# Altium PCB ika_pcb.PcbDoc (part 3 of 3)
Units mil, origin at the board's own origin, x right, y up, seen from the top; angles counter-clockwise.
Board outline 5430 x 4360 mil, 2 copper layers (Top Layer, Bottom Layer); 129 components, 109 nets, 436 pads, 110 vias.
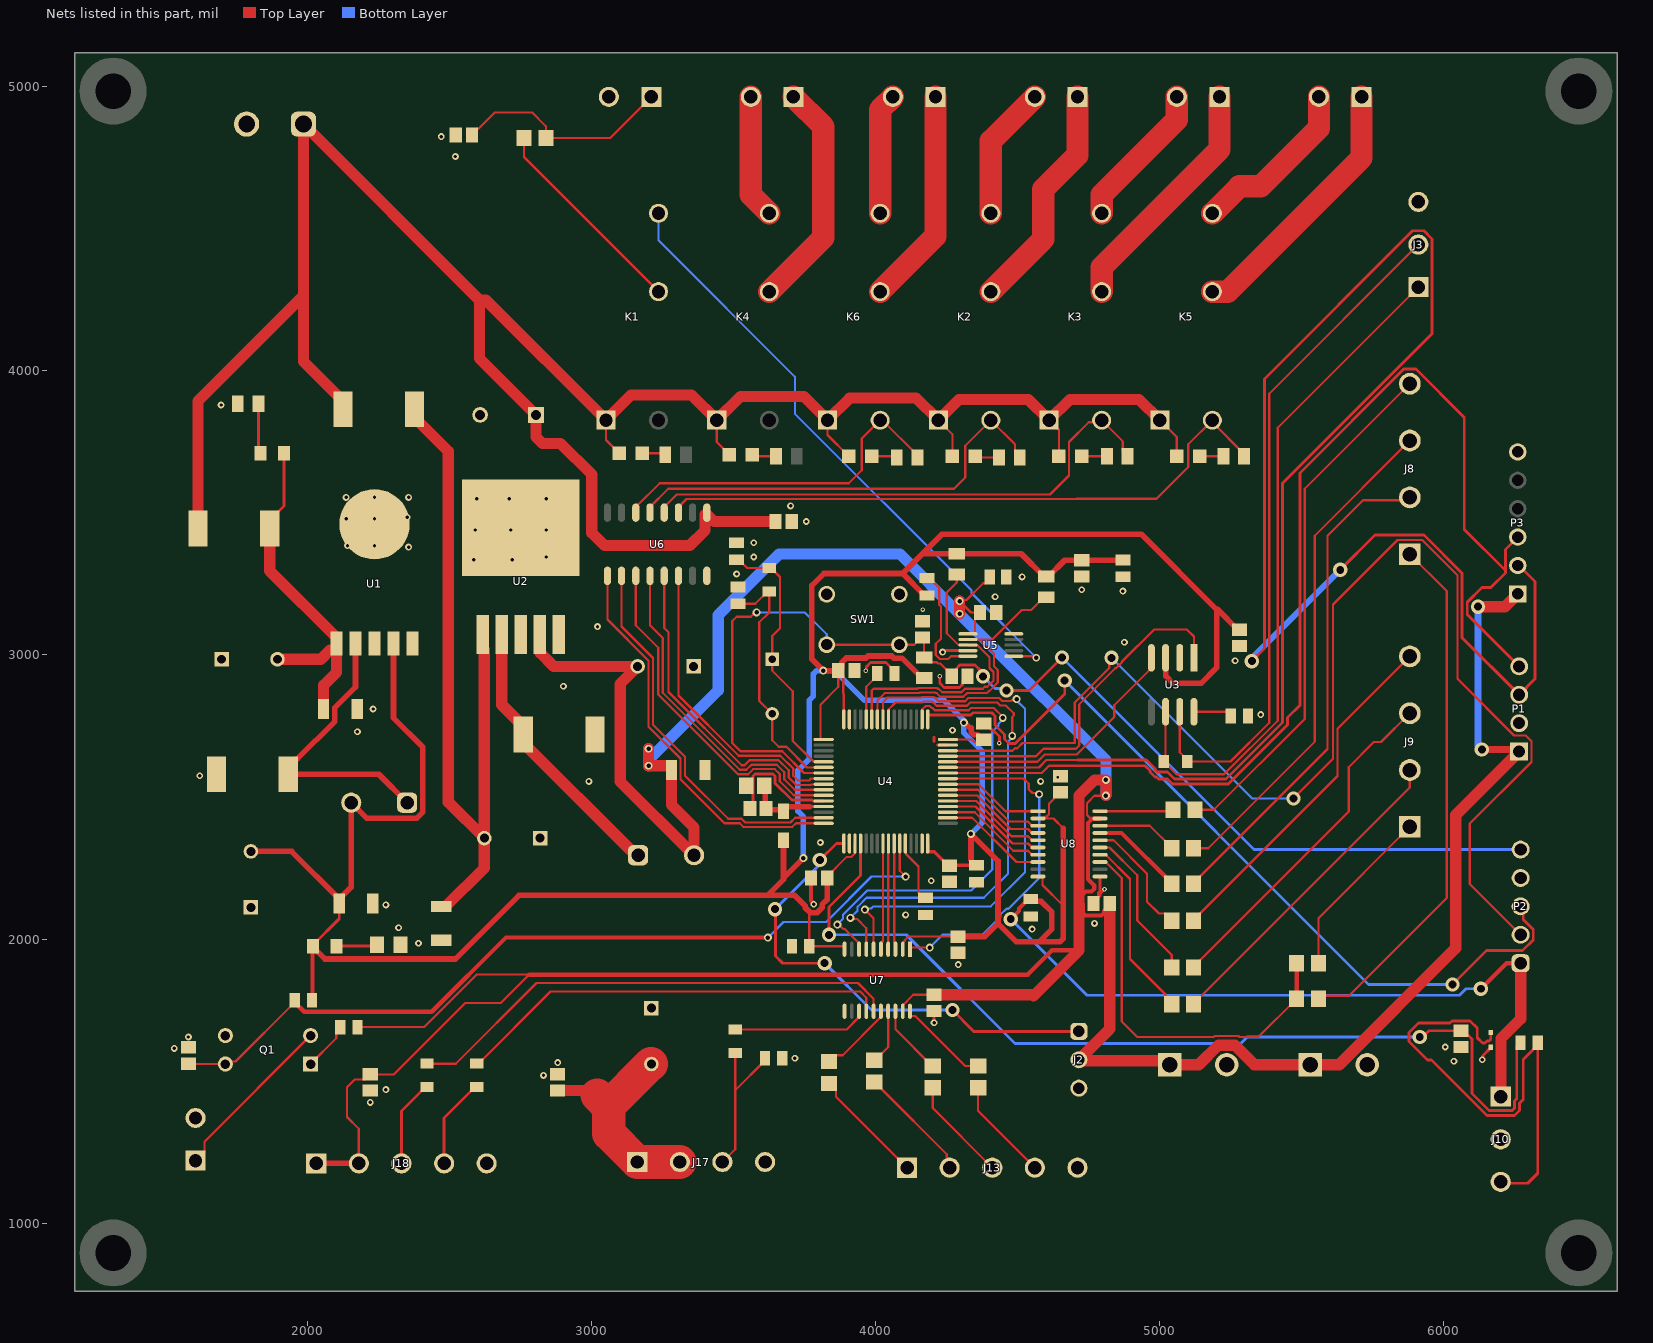
[diagram p2: the nets of this part, all layers, seen from the top]

## Via types
v1: diameter 24, hole 12, Top Layer to Bottom Layer, 63 vias
v2: diameter 27.56, hole 15.75, Top Layer to Bottom Layer, 22 vias
v3: diameter 50, hole 28, Top Layer to Bottom Layer, 19 vias
v4: diameter 16, hole 8, Top Layer to Bottom Layer, 5 vias
v5: diameter 12, hole 8, Top Layer to Bottom Layer, 1 vias

## Nets (pads, with @x,y where several pads share a name; then routed paths per layer and width w, separated by ;. In a path a pad name is that pad's centre, name@x,y a point inside that pad or via, vN(x,y) a via of type N, cw(c..) or ccw(c..) an arc to the next point about the centre after c; other vN are vias at no path point) (continued)
3.3V: C1.2 C3.1 C11.1 C12.2 C13.1 C17.1 C18.2 C19.2 C20.2 C21.2 C29.2 C31.2 D5.2 FB1.1 J10.01 L1.2 P2.1 R3.1 R5.2 R6.2 R10.2 R15.1 R31.2 R46.1 U1.4 U3.3 U4.1 U4.19 U4.32 U4.48 U4.64 U7.2 U7.10 U8.2 U8.10 | length 16013.2
  Top Layer w7.87: 3711.08,2153.54 3744.48,2120.15 3753.05,2111.57 ; 3765.55,2099.07 R46.1@3765.55,1975 3887.28,1975 3889.84,1972.44 U7.10@3889.84,1964.27 ; U4.1@3816.5,2702.64 3806.82,2702.64 3805,2704.46 3805,2825 3867.91,2887.91 C19.2@3867.91,2945 3885.63,2927.28 3885.63,2864.47 3887.36,2862.74 U4.64@3887.36,2773.5 ; C20.2@3828.54,2219.92 3897.87,2289.25 3914.39,2289.25 3925.98,2300.85 3925.98,2335.74 U4.19@3926.73,2336.5 ; U7.2@4094.57,1964.27 4094.57,1985.74 4101.64,1992.81 4101.64,1995.84 4114.46,2008.67 4289.88,2008.67 C29.2@4290,2008.54 ; U4.48@4253.5,2702.64 4337.36,2702.64 4346.23,2693.77 4362.41,2693.77 4366.18,2690 C18.2@4378.82,2702.64 ; U8.10@4570.73,2219.84 4584.21,2219.84 4586.77,2217.28 4586.77,2190.26 4660,2117.02 ; U8.2@4570.73,2424.57 U8.2@4592.21,2424.57 ; C31.2@4650,2516.46 4645.08,2516.46 4627.36,2498.74 4627.36,2493.82 4609.23,2475.68 4609.23,2438.56 4602.31,2431.64 4599.28,2431.64 U8.2@4592.21,2424.57 ; 4660,2390 4625.43,2424.57 U8.2@4592.21,2424.57
  Top Layer w10: D5.2@2018.66,1978.94 2110.94,2071.22 C3.1@2110.94,2125
  Top Layer w11.81: U4.32@4182.64,2336.5 4182.64,2307.36 4206.26,2307.36 4255.08,2258.54 C21.2@4260,2258.54 4260.98,2259.53 C17.1@4341.89,2259.53
  Top Layer w15: R3.1@2015.55,1785 2017.11,1786.55 2017.11,1973.45 D5.2@2018.66,1975 ; v3(4475,2070) 4503.84,2098.84 4503.84,2107.34 4537.05,2140.55 R31.2@4545,2140.55 ; v3(6130,1825) 6220,1915 P2.1@6270,1915
  Top Layer w19.68: C1.2@1800,2308.43 1943.27,2308.43 C3.1@2110.94,2140.75 ; D5.2@2018.66,1971.06 2060.16,1929.57 2519.57,1929.57 2743.54,2153.54 3618.54,2153.54 ; C3.1@2110.94,2125 C3.1@2110.94,2140.75 ; U1.4@2301.93,3040 2301.93,2778.7 2405.28,2675.35 2405.28,2446.73 2383.27,2424.72 2208.43,2424.72 L1.2@2153.15,2480 2153.15,2182.95 C3.1@2110.94,2140.75 ; FB1.1@3675,2347.64 3675,2215 ; v2(3745,2285) 3675,2215 ; C20.2@3828.54,2215 3828.54,2138.49 3811.07,2121.01 3811.07,2110.15 3793.66,2092.75 3769.04,2092.75 3751.63,2110.15 3751.63,2116.52 3714.61,2153.54 3711.08,2153.54 3618.54,2153.54 ; R15.1@4170,2918.56 4162.11,2918.56 4091.5,2989.17 4063.38,2989.17 4056.18,2996.37 3972.42,2996.37 3965.34,2989.29 3896.01,2989.29 3879.72,2973.01 3879.72,2956.81 C19.2@3867.91,2945 v2(3815,2945) 3775,2985 3775,3245 3816.85,3286.85 4094.65,3286.85 ; R10.2@4180,3209.45 4172.05,3209.45 4094.65,3286.85 ; C29.2@4290,2008.54 4383.54,2008.54 4430,2055 ; v2(4310,2762.28) 4312.13,2762.28 4330.12,2744.29 4335.71,2744.29 4335.71,2729.55 4346.09,2719.17 4357.36,2719.17 4375.08,2701.46 4377.64,2701.46 C18.2@4380,2701.46 ; C17.1@4355,2259.53 4347.13,2259.53 4338.27,2268.39 4338.27,2276.26 4335,2279.53 v2(4335,2370) 4430,2275 4430,2055 ; R31.2@4545,2140.55 4552.99,2132.56 4582.44,2132.56 4620,2095 4620,2035 4575,1990 ; 4660,2390 4660,2117.02 4660,2001.53 4648.47,1990 4575,1990 ; C11.1@4870,3334.53 4869.51,3334.04 4725.49,3334.04 C12.2@4725,3333.54 4665,3333.54 4607.89,3276.44 R6.2@4600,3276.44 4592.11,3276.44 4512.11,3356.44 R5.2@4285,3356.44 4164.24,3356.44 ; U3.3@5020,2990.02 5020.92,2989.1 5020.92,2925.61 5046.53,2900 5145,2900 5200,2955 5200,3160 ; C13.1@5280,3088.54 5275.08,3088.54 5203.62,3160 5200,3160 ; 3618.54,2153.54 3675,2210 3675,2215 ; 4094.65,3286.85 4164.24,3356.44 ; 4164.24,3356.44 4232.81,3425 4935,3425 5200,3160 ; 4430,2055 4495,1990 4575,1990
  Top Layer w40: J10.01@6200,1445 6200.75,1445.75 6200.75,1649.34 6270,1718.59 P2.1@6270,1915
  Bottom Layer w10: v3(4475,2070) 4742.87,1802.13 6055.31,1802.13 6078.18,1825 v3(6130,1825)
  Bottom Layer w19.68: v2(3745,2285) 3745,2430.59 3725.47,2450.12 3725.47,2593.57 3765,2633.1 3765,2840 3780,2855 3780,2933.47 3791.53,2945 v2(3815,2945) 3855,2945 3960,2840 4240,2840 4310,2770 v2(4310,2762.28) 4310,2725.59 4375,2660.59 4375,2410 v2(4335,2370)
3C: K6.4 R22.1 U6.14 | length 1262.3
  Top Layer w7.87: U6.14@3155,3501.22 3155,3520.91 3239.09,3605 3905,3605 3950.19,3650.19 3950.19,3761.84 K6.4@4015,3826.65 4022.68,3826.65 4146.44,3702.89 R22.1@4146.44,3695
4C: K2.4 R23.1 U6.13 | length 1585.4
  Top Layer w7.87: U6.13@3205,3501.22 3205,3520.91 3269.09,3585 4275,3585 4315,3625 4315,3736.65 K2.4@4405,3826.65 4489.6,3742.05 4489.6,3711.84 R23.1@4506.44,3695
5C: K3.4 R24.1 U6.12 | length 1920.2
  Top Layer w7.87: U6.12@3255,3501.22 3255,3520.91 3299.09,3565 4613.35,3565 4680,3631.65 4680,3750 4749.72,3819.72 4788.07,3819.72 K3.4@4795,3826.65 4869.6,3752.05 4869.6,3716.84 R24.1@4886.44,3700
5V: C6.2 C8.1 C15.1 C16.2 C30.2 C32.2 C34.1 J2.2 J6.1 J7.1 J18.01 J18.02 L2.2 P1.1 P3.1 R4.1 U2.4 U5.1 U7.19 U8.19 | length 14405.1
  Top Layer w7.87: R4.1@2175.55,1690 2410,1690 2595,1875 2780,1875 2680,1775 2555,1775 2303.54,1523.54 C34.1@2220,1523.54 2202.28,1505.83 2165.83,1505.83 2138.26,1478.26 2138.26,1373.52 2180,1331.78 J18.02@2180,1210 ; U7.19@4094.57,1745.73 4094.57,1766.31 4131.8,1803.54 C30.2@4205,1803.54 ; U5.1@4324.29,3074.37 4346.92,3074.37 4348.74,3076.19 4348.74,3132.28 C16.2@4366.46,3150 4335,3150 v2(4295,3190) 4298.77,3193.77 4319.24,3193.77 4377.83,3252.36 4385.71,3252.36 4400.47,3267.13 C15.1@4400.47,3275 ; 4755.43,2424.57 4743.26,2436.74 4743.26,2478.26 4769.41,2504.41 4809.41,2504.41 v2(4810,2505)
  Top Layer w15: 4715,2133.33 4720.64,2133.33 4729.43,2124.54 4729.43,2092.06 4738.44,2083.05 4794.48,2083.05 4803.48,2092.06 4803.48,2100.02 4823.54,2120.08 C32.2@4823.54,2125 ; 4729.43,2157.94 4738.75,2167.27 4759.57,2167.27 4768.89,2176.59 4768.89,2189.01 4747.21,2210.7 4747.21,2408.12 4762.86,2423.77 4788.48,2423.77 U8.19@4789.27,2424.57 ; P1.1@6258.05,2666.95 P1.1@6265,2660
  Top Layer w15.75: 2780,1875 3802.37,1875 3803.12,1874.25 3836.88,1874.25 3837.63,1875 4535,1875 4620,1960 4715,1960
  Top Layer w19.68: J18.01@2030,1210 J18.02@2180,1210
  Top Layer w25: v3(6133.54,2666.95) P1.1@6258.05,2666.95
  Top Layer w39.37: U2.4@2816.93,3071.81 2818.9,3069.84 2818.9,3007.25 2866.14,2960 C6.2@3161.57,2960 3100,2898.43 3100,2555 L2.2@3360,2295 3360,2393.06 3280.94,2472.11 C8.1@3280.94,2595 ; v2(3200,2670) v2(3200,2610) 3280.94,2610 C8.1@3280.94,2610.75 ; C30.2@4205,1803.54 4551.46,1803.54 4555,1800 4715,1960 4715,2133.33 4715,2505 4770,2560 v2(4810,2560) v2(4810,2505) ; v2(4295,3145) v2(4295,3190)
  Top Layer w40: C32.2@4823.54,2125 4823.54,1683.54 J2.2@4715,1575 4718.8,1571.2 5021.28,1571.2 J7.1@5035,1557.48 5137.12,1557.48 5206.33,1626.69 5263.67,1626.69 5332.88,1557.48 J6.1@5530,1557.48 5631.34,1557.48 6041.81,1967.95 6041.81,2436.81 P1.1@6265,2660 ; v3(6120,3170) 6215,3170 P3.1@6260,3215
  Bottom Layer w10: v3@6120,2680.49 v3(6133.54,2666.95)
  Bottom Layer w25: v3@6120,2680.49 v3(6120,3170)
  Bottom Layer w39.37: v2(3200,2610) 3200,2630.1 ; v2(3200,2670) 3200,2630.1 ; v2(4295,3190) v2(4295,3145) ; v2(4810,2505) v2(4810,2560) 4810,2630 4380,3060 v2(4295,3145) ; 3200,2630.1 3445,2875.1 3445,3140 3660,3355 4085,3355 v2(4295,3145)
6C: K5.4 R25.1 U6.11 | length 2246
  Top Layer w7.87: U6.11@3305,3501.22 3305,3520.91 3333.35,3549.25 4706.52,3549.25 4707.27,3550 4988.35,3550 5100,3661.65 5100,3741.65 K5.4@5185,3826.65 5185,3819.33 5296.44,3707.89 R25.1@5296.44,3700
12V: C27.1 C28.2 D1.2 D6.1 D7.1 D8.1 D9.1 D10.1 D11.1 D12.2 J1.1 K1.1 K2.1 K3.1 K4.1 K5.1 K6.1 U6.9 | length 8456.9
  Top Layer w7.87: K1.1@3049.96,3826.65 3049.96,3757.04 D6.1@3097,3710 ; K4.1@3439.96,3826.65 3439.96,3749.54 D7.1@3484.5,3705 ; K6.1@3829.96,3826.65 3829.96,3774.54 D8.1@3904.5,3700 ; K2.1@4219.96,3826.65 4269.5,3777.11 D9.1@4269.5,3700 ; K3.1@4609.96,3826.65 4644.5,3792.11 D10.1@4644.5,3700 ; K5.1@4999.96,3826.65 5059.5,3767.11 D11.1@5059.5,3700
  Top Layer w39.37: D1.2@1613.82,3445 1613.82,3893.82 1985,4265 ; D12.2@2123.82,3865 2123.82,3894.13 1985,4032.95 1985,4265 ; C28.2@3646.46,3470 3430.32,3470 3405.98,3494.33 3398.11,3494.33 3398.11,3438.11 3345,3385 3045,3385 3000,3430 3000,3635 2890,3745 2826.49,3745 2803.43,3768.06 C27.1@2803.43,3845 2605,4043.43 2605,4248.94 ; K5.1@4999.96,3826.65 4926.61,3900 4683.31,3900 K3.1@4609.96,3826.65 4536.61,3900 4293.31,3900 K2.1@4219.96,3826.65 4141.61,3905 3908.31,3905 K6.1@3829.96,3826.65 3746.61,3910 3523.31,3910 K4.1@3439.96,3826.65 3351.61,3915 3138.31,3915 K1.1@3049.96,3826.65 2627.68,4248.94 2605,4248.94 ; 1985,4265 J1.1@1985,4868.94 2605,4248.94
24V: C25.2 C26.2 J17.01 J17.02 | length 802.9
  Top Layer w39.37: C26.2@2880,1466.46 3002.08,1466.46 3018.54,1450
  Top Layer w118.11: 3018.54,1450 3057.85,1410.69 ; C25.2@3210,1560 3207.15,1560 3057.85,1410.69 ; J17.02@3310,1215 J17.01@3160,1215 3060,1315 3060,1390.81 3057.85,1392.97 3057.85,1410.69
A1: U4.40 U8.1 | length 356.6
  Top Layer w7.87: U4.40@4253.5,2545.16 4361.37,2545.16 4456.37,2450.16 U8.1@4570.73,2450.16
A2: U4.39 U8.3 | length 369.6
  Top Layer w7.87: U4.39@4253.5,2525.47 4358.78,2525.47 4470.87,2413.39 4535.75,2413.39 4550.16,2398.98 U8.3@4570.73,2398.98
A3: U4.38 U8.4 | length 372.1
  Top Layer w7.87: U4.38@4253.5,2505.79 4356.2,2505.79 4474.19,2387.8 4535.75,2387.8 4550.16,2373.39 U8.4@4570.73,2373.39
A4: U4.37 U8.5 | length 374.5
  Top Layer w7.87: U4.37@4253.5,2486.1 4353.61,2486.1 4477.51,2362.2 4535.75,2362.2 4550.16,2347.8 U8.5@4570.73,2347.8
A5: U4.36 U8.6 | length 377
  Top Layer w7.87: U4.36@4253.5,2466.42 4351.02,2466.42 4480.83,2336.61 4535.75,2336.61 4550.16,2322.2 U8.6@4570.73,2322.2
A6: U4.35 U8.7 | length 379.4
  Top Layer w7.87: U4.35@4253.5,2446.73 4348.44,2446.73 4484.15,2311.02 4535.75,2311.02 4550.16,2296.61 U8.7@4570.73,2296.61
A7: U4.34 U8.8 | length 381.9
  Top Layer w7.87: U4.34@4253.5,2427.05 4339.04,2427.05 4495.07,2271.02 U8.8@4570.73,2271.02
CAN_RX: U3.4 U4.44 | length 913.4
  Top Layer w7.87: U4.44@4253.5,2623.9 4568.9,2623.9 4595,2650 4707.27,2650 4839.17,2781.9 4839.17,2822.84 4970,2953.66 U3.4@4970,2990.02
CAN_TX: U3.1 U4.45 | length 1222.9
  Top Layer w7.87: U4.45@4253.5,2643.58 4563.58,2643.58 4590,2670 4705,2670 4716.14,2681.14 4716.14,2826.14 4843.19,2953.19 4845.25,2953.19 4866.81,2974.75 4866.81,2976.81 4980,3090 5095,3090 5120,3065 U3.1@5120,2990.02
CANH: J3.02 R7.2 U3.7 | length 2432.3
  Top Layer w7.87: U3.7@5070,2799.98 5070,2657.24 5096.34,2630.91 R7.2@5096.34,2625 5248.87,2625 5385,2761.13 5385,3920 J3.02@5910,4445
CANL: J3.01 R7.1 U3.6 | length 2410.4
  Top Layer w7.87: U3.6@5020,2799.98 5020,2631.34 R7.1@5013.66,2625 5013.66,2619.09 5027.44,2605.31 5033.35,2605.31 5058.66,2580 5226.15,2580 5415,2768.85 5415,3800 J3.01@5910,4295
CUBE_RX_OUT: P1.4 P3.3 U4.42 | length 4249.1
  Top Layer w7.87: U4.42@4253.5,2584.53 4584.53,2584.53 4610,2610 4710,2610
  Top Layer w10: 4710,2610 4948.15,2610 4965.2,2592.95 4965.2,2588.64 4983.21,2570.63 4987.52,2570.63 4994.96,2563.19 5026.42,2563.19 5044.29,2545.32 5240.51,2545.32 5449.69,2754.49 5449.69,2779.77 5493.19,2823.27 5493.19,3640.68 5858.77,4006.26 5901.23,4006.26 6071.63,3835.86 6071.63,3442.01 6216.61,3297.03 ; P3.3@6260,3415 6216.61,3371.61 6216.61,3297.03 ; P1.4@6265,2960 6082.13,3142.87 6082.13,3185.69 6133.65,3237.22 6165.09,3237.22 6216.61,3288.74 6216.61,3297.03
CUBE_TX_IN: P1.3 P3.2 U4.43 | length 7056.2
  Top Layer w7.87: U4.43@4253.5,2604.21 4574.21,2604.21 4600,2630 4710,2630
  Top Layer w10: 4710,2630 4953.43,2630 4983.07,2600.36 4983.07,2596.05 4990.61,2588.5 5026.38,2588.5 5051.7,2563.19 5233.11,2563.19 5431.81,2761.89 5431.81,3604.58 5958.31,4131.08 5958.31,4465.01 5930.01,4493.31 5889.99,4493.31 5368.19,3971.51 5368.19,3022.63 v3(5323.64,2978.08) ; v3(5635,3300) 5757.01,3422.01 5930.24,3422.01 6064.25,3288 6064.25,3060.75 P1.3@6265,2860 6321.26,2916.26 6321.26,3258.25 6264.51,3315 P3.2@6260,3315
  Bottom Layer w19.68: v3(5323.64,2978.08) 5323.64,2988.64 v3(5635,3300)
DAC_OUT_A: K1.2 U5.6 | length 2197.5
  Top Layer w7.87: U5.6@4485.71,2995.63 4554.04,2995.63 4559.67,2990 v2(4565,2990)
  Bottom Layer w7.87: K1.2@3235,4555 3235,4460 3715,3980 3715,3849.54 4336.5,3228.05 4336.5,3218.5 v2(4565,2990)
ECHO_1: R30.1 U8.20 | length 259.3
  Top Layer w7.87: U8.20@4789.27,2450.16 5041.74,2450.16 R30.1@5046.58,2455
ECHO_2: R28.1 U8.18 | length 286.3
  Top Layer w7.87: U8.18@4789.27,2398.98 4964.72,2398.98 5041.58,2322.12 R28.1@5041.58,2320
ECHO_3: R27.1 U8.17 | length 327.4
  Top Layer w15: U8.17@4789.27,2373.39 4865.31,2373.39 5041.58,2197.12 R27.1@5041.58,2195
ECHO_4: R32.1 U8.16 | length 428.3
  Top Layer w7.87: U8.16@4789.27,2347.8 4837.2,2347.8 4955,2230 4955,2131.58 4996.74,2089.85 5018.85,2089.85 5041.58,2067.12 R32.1@5041.58,2065
ECHO_5: R29.1 U8.15 | length 546.4
  Top Layer w7.87: U8.15@4789.27,2322.2 4822.8,2322.2 4920,2225 4920,2065 5041.58,1943.42 R29.1@5041.58,1900
ECHO_6: R26.1 U8.14 | length 643.2
  Top Layer w7.87: U8.14@4789.27,2296.61 4809.84,2296.61 4895,2211.45 4895,1930 5020.09,1804.91 5020.09,1791.49 R26.1@5041.58,1770
GND: C1.1 C2.1 C3.2 C4.2 C5.1 C6.1 C7.2 C8.2 C9.1 C10.1 C11.2 C12.1 C13.2 C14.1 C15.2 C16.1 C17.2 C18.1 C19.1 C20.1 C21.1 C22.1 C23.1 C24.1 C25.1 C26.1 C27.2 C28.1 C29.1 C30.1 C31.1 C32.1 C33.1 C34.2 C35.1 C36.1 D2.2 D3.2 D13.2 J1.2 J2.3 J3.03 J4.02 J6.2 J7.2 J10.02 J11.02 J13.05 J17.04 J18.05 P1.2 P2.4 P3.6 Q1.3 R1.1 R2.1 R9.2 R11.1 R13.2 R18.1 R31.1 R46.2 SW1.A1 SW1.A2 U1.3 U1.5 U1.6 U2.3 U2.5 U2.6 U3.2 U4.12 U4.18 U4.31 U4.47 U4.63 U5.4 U5.10 U6.8 U7.11 U8.11 | length 1321.6
  Top Layer w10: C23.1@3556.46,2460 3568.03,2471.58 3568.03,2573.88 3575.57,2581.42 3637.42,2581.42 3644.96,2573.88 3644.96,2548.6 3704.42,2489.13 3775.83,2489.13 3778.51,2486.45 3816.15,2486.45 U4.12@3816.5,2486.1 ; v4(3965,2945) 3966.15,2946.15 3966.15,2957.97 3981.83,2973.66 4035.4,2973.66 4066.11,2942.95 R13.2@4066.11,2935 ; v1(4205,1705) C30.1@4205,1746.46 ; 4205.2,2694.86 4205.2,2710.42 ; 4216.76,2683.3 4253.16,2683.3 U4.47@4253.5,2682.95 ; v4(4225,2925) 4225,2901.01 4240.45,2885.55 4294.43,2885.55 4305.91,2897.03 4305.91,2908.35 C35.1@4322.56,2925 ; v1(4235,3010) 4238.79,3010 4244.1,3015.32 U5.4@4324.29,3015.32 ; C18.1@4380,2758.54 4384.92,2758.54 4407.48,2735.98 4411.91,2735.98 4434.89,2713 4434.89,2690.11 v4(4435,2690) ; U8.11@4789.27,2219.84 4789.27,2168.15 4783.11,2161.99 4783.11,2141.65 C32.1@4766.46,2125 4766.46,2129.92 4789.02,2152.48 4789.02,2158.46 4805,2174.44 v4(4805,2175) ; v1(6135,1575) 6137.68,1577.68 6137.68,1590.12 6165,1617.44 D13.2@6165,1619.02
  Top Layer w15: C20.1@3771.46,2215 3771.46,2134.79 3781.35,2124.9 v1(3781.35,2122.46)
  other v1: 2220,1425 2275,1470 2830,1520 2880,1565 6035,1570 3715,1580 1530,1615 6005,1620 1580,1655 4290,1910 2390,1985 4550,2035 2320,2040 4770,2055 4105,2085 2275,2120 4195,2205 3805,2340 2990,2555 4580,2555 1620,2575 2175,2730 4270,2735 5355,2790 2230,2810 2900,2890 5265,2980 4875,3045 3020,3100 4420,3205 4870,3225 4725,3230 4515,3275 3510,3285 2585,3335 2720,3335 2840,3345 3570,3345 2355,3380 2140,3385 2235,3385 3570,3395 2590,3440 2715,3440 2840,3440 3755,3470 2135,3480 2235,3480 2350,3485 3700,3525 2595,3550 2710,3550 2840,3550 2135,3555 2235,3555 2355,3555 1695,3880 2520,4755 2470,4825
  other v4: 4165,3160
  other v5: 4640,2570
I2C1_SCL: R6.1 U4.58 U5.2 | length 1043.5
  Top Layer w7.87: U4.58@4005.47,2773.5 4005.47,2839.72 4031.5,2865.75 4153.49,2865.75 4155.73,2867.99 4209.55,2867.99 4211.79,2865.75 4214.21,2865.75 4226.97,2852.99 4307.91,2852.99 4320.67,2865.75 4390.75,2865.75 4397.44,2872.44 4398.86,2872.44 4429.65,2903.23 4429.65,2946.77 4415.75,2960.67 4415.75,3004.25 4366.07,3053.93 ; U5.2@4324.29,3054.69 4366.07,3054.69 4409.69,3054.69 4513.56,3158.56 4547.11,3158.56 4592.11,3203.56 R6.1@4600,3203.56
I2C1_SDA: R5.1 U4.59 U5.3 | length 1051.1
  Top Layer w7.87: U4.59@3985.79,2773.5 3985.79,2875.39 3991.9,2881.5 4146.96,2881.5 4149.21,2883.74 4216.07,2883.74 4218.31,2881.5 4220.74,2881.5 4233.49,2868.74 4301.39,2868.74 4314.15,2881.5 4376.5,2881.5 4383.19,2888.19 4392.33,2888.19 4413.9,2909.75 4413.9,2940.25 4400,2954.15 4400,2992.22 4357.97,3034.25 U5.3@4324.29,3034.25 ; R5.1@4285,3283.56 4285,3255 4250,3220 4250,3076.36 4290.61,3035.75 4323.54,3035.75 U5.3@4324.29,3035
LPWM: U4.57 U7.6 | length 1947.7
  Top Layer w7.87: v2(3961.5,2103.5) 3992.2,2072.8 U7.6@3992.2,1964.27 ; U4.57@4025.16,2773.5 4025.16,2833.66 4041.5,2850 4160.01,2850 4162.25,2852.24 4203.02,2852.24 4205.27,2850 4207.69,2850 4220.45,2837.24 4314.44,2837.24 4325.7,2848.5 4434.44,2848.5 4444.75,2838.19 4475.25,2838.19 4477.93,2840.87 4491.66,2840.87 v2(4495.42,2844.64)
  Bottom Layer w7.87: v2(3961.5,2103.5) 3965.27,2107.26 3983.29,2107.26 3991.03,2115 4405,2115 4525,2235 4525,2810.54 4495.42,2840.12 v2(4495.42,2844.64)
LPWM_OUT: R16.1 U7.15 | length 1756.8
  Top Layer w7.87: R16.1@2420,1561.34 2521.34,1561.34 2805,1845 3937.27,1845 3992.2,1790.07 U7.15@3992.2,1745.73
NetC2_2: C2.2 C4.1 D12.1 U2.1 | length 2643.7
  Top Layer w39.37: D12.1@2376.18,3865 2376.18,3835.87 2495,3717.05 2495,2481.57 C2.2@2621.57,2355 ; C4.1@2470,2114.06 2485.75,2114.06 2621.57,2249.88 C2.2@2621.57,2355 ; U2.1@2616.14,3071.81 2616.14,3024.57 2621.57,3019.13 C2.2@2621.57,2355
NetC5_2: C5.2 C7.1 D1.1 D4.2 U1.1 | length 1279.9
  Top Layer w10: D1.1@1866.18,3474.13 1916.34,3524.29 D4.2@1916.34,3710
  Top Layer w39.37: D1.1@1866.18,3474.13 D1.1@1866.18,3445 1866.18,3296.42 2101.14,3061.46 U1.1@2101.14,3040 ; C5.2@1893.43,2985 2046.14,2985 2078.31,3017.17 2099.76,3017.17 2101.14,3018.54 U1.1@2101.14,3040 ; C7.1@2055.94,2810 2055.94,2893.23 2101.14,2938.43 U1.1@2101.14,3040
NetC36_2: C36.2 J11.01 R47.2 | length 789.2
  Top Layer w7.87: C36.2@2578.54,4830 2578.54,4834.92 2596.26,4852.64 2601.18,4852.64 2658.54,4910 2790,4910 2838.42,4861.58 R47.2@2838.42,4820 3065,4820 J11.01@3210,4965
NetD2_1: D2.1 L1.1 U1.2 | length 1022.5
  Top Layer w19.68: U1.2@2168.07,3040 2168.07,2887.2 2095.47,2814.6 2095.47,2766.35 1962.27,2633.15 1955.2,2633.15 1931.18,2609.13 D2.1@1931.18,2580 2250,2580 L1.1@2350,2480
NetD3_1: D3.1 L2.1 U2.2 | length 980.6
  Top Layer w39.37: U2.2@2683.07,3071.81 2683.07,2824.88 2758.82,2749.13 D3.1@2758.82,2720 2758.82,2690.87 3138.94,2310.75 3147.4,2310.75 L2.1@3163.15,2295
NetD4_1: D4.1 R1.2 | length 178
  Top Layer w10: R1.2@1826.44,3885 1826.44,3717.23 D4.1@1833.66,3710
NetD5_1: D5.1 R2.2 | length 144.4
  Top Layer w10: D5.1@2101.34,1975 2238.66,1975 R2.2@2243.66,1980
NetD6_2: D6.2 R20.2 | length 82.6
  Top Layer w7.87: D6.2@3178,3710 3253.56,3710 R20.2@3258.56,3705
NetD7_2: D7.2 R21.2 | length 85.1
  Top Layer w7.87: D7.2@3565.5,3705 3570.5,3700 R21.2@3648.56,3700
NetD8_2: D8.2 R22.2 | length 90.1
  Top Layer w7.87: D8.2@3985.5,3700 4068.56,3700 R22.2@4073.56,3695
NetD9_2: D9.2 R23.2 | length 85.1
  Top Layer w7.87: D9.2@4350.5,3700 4355.5,3695 R23.2@4433.56,3695
NetD10_2: D10.2 R24.2 | length 88.1
  Top Layer w7.87: D10.2@4725.5,3700 R24.2@4813.56,3700
NetD11_2: D11.2 R25.2 | length 83.1
  Top Layer w7.87: D11.2@5140.5,3700 R25.2@5223.56,3700
NetD13_1: D13.1 J10.03 R35.1 | length 1785.6
  Top Layer w10: D13.1@6165,1670.98 6165,1647.2 6159.14,1641.34 6151.79,1641.34 6144.25,1633.8 6135.97,1633.8 6117.32,1652.44 6117.32,1686.2 6091.91,1711.61 6028.09,1711.61 6020.55,1704.07 5910.51,1704.07 5877.13,1670.69 5877.13,1639.31 5941.73,1574.71 5955.94,1574.71 6151.83,1378.82 6248.17,1378.82 6266.18,1396.83 6266.18,1422.11 6279.24,1435.17 6279.24,1575.74 R35.1@6330.55,1627.05 ; J10.03@6200,1145 6205,1140 6295,1140 6330.55,1175.55 R35.1@6330.55,1627.05 ; R35.1@6330.55,1635 R35.1@6330.55,1627.05
NetJ8_1: J8.1 R14.2 | length 1862.8
  Top Layer w7.87: R14.2@5558.42,1790 5568.42,1800 5665.57,1800 6010,2144.43 6010,3225 J8.1@5880,3355
NetJ8_2: J8.2 R27.2 | length 1766.3
  Top Layer w7.87: R27.2@5118.42,2195 5118.42,2197.12 5590,2668.7 5590,3420 5715,3545 5870,3545 J8.2@5880,3555
NetJ8_3: J8.3 R28.2 | length 1780.7
  Top Layer w7.87: R28.2@5118.42,2320 5170,2320 5545,2695 5545,3420 J8.3@5880,3755
NetJ8_4: J8.4 R30.2 | length 1852.4
  Top Layer w7.87: R30.2@5123.42,2455 5190,2455 5510,2775 5510,3585 J8.4@5880,3955
NetJ9_1: J9.1 R12.2 | length 613.2
  Top Layer w7.87: R12.2@5558.42,1915 5558.42,2073.42 J9.1@5880,2395
NetJ9_2: J9.2 R26.2 | length 1140.5
  Top Layer w7.87: R26.2@5118.42,1770 5118.42,1772.12 5880,2533.7 J9.2@5880,2595
NetJ9_3: J9.3 R29.2 | length 1225.1
  Top Layer w7.87: R29.2@5118.42,1900 5118.42,1902.12 5665,2448.7 5665,2605 5753.41,2693.41 5778.41,2693.41 J9.3@5880,2795
NetJ9_4: J9.4 R32.2 | length 1245.5
  Top Layer w7.87: R32.2@5118.42,2065 5118.42,2067.12 5625,2573.7 5625,2740 J9.4@5880,2995
NetJ12_01: J12.01 K2.3 | length 811.9
  Top Layer w78.74: K2.3@4405,4279.41 4590,4464.41 4590,4640 4710,4760 J12.01@4710,4965
NetJ12_02: J12.02 K2.2 | length 474.2
  Top Layer w78.74: K2.2@4405,4555 4405,4810 J12.02@4560,4965
NetJ13_01: J13.01 R33.2 | length 411.7
  Top Layer w7.87: R33.2@3835,1491.58 3837.12,1491.58 3859.85,1468.85 3859.85,1445.15 J13.01@4110,1195
NetJ13_02: J13.02 R34.2 | length 412.6
  Top Layer w7.87: R34.2@3995,1496.58 3997.12,1496.58 4019.85,1473.85 4019.85,1471.74 4249.34,1242.24 4249.34,1205.66 J13.02@4260,1195
NetJ13_03: J13.03 R36.2 | length 368.6
  Top Layer w7.87: R36.2@4200,1476.58 4200,1405 J13.03@4410,1195
NetJ13_04: J13.04 R37.2 | length 364.4
  Top Layer w7.87: R37.2@4360,1476.58 4360,1395 J13.04@4560,1195
NetJ15_01: J15.01 K3.3 | length 857.5
  Top Layer w78.74: K3.3@4795,4279.41 4795,4365 5210,4780 J15.01@5210,4965
NetJ15_02: J15.02 K3.2 | length 519.8
  Top Layer w78.74: K3.2@4795,4555 4795,4620 5060,4885 J15.02@5060,4965
NetJ16_01: J16.01 K4.3 | length 807.8
  Top Layer w78.74: K4.3@3625,4279.41 3815,4469.41 3815,4860 J16.01@3710,4965
NetJ16_02: J16.02 K4.2 | length 436.9
  Top Layer w78.74: J16.02@3560,4965 3560,4620 K4.2@3625,4555
NetJ17_03: J17.03 R18.2 R19.2 | length 560.6
  Top Layer w7.87: J17.03@3460,1215 3505,1260 3505,1465 ; R19.2@3505,1598.66 3505,1465 ; R18.2@3609.45,1580 3609.45,1572.05 3505,1467.61 3505,1465
NetJ18_03: J18.03 R16.2 | length 309.4
  Top Layer w10: J18.03@2330,1210 2330,1394.57 R16.2@2414.09,1478.66
  Top Layer w19.68: R16.2@2414.09,1478.66 R16.2@2420,1478.66
NetJ18_04: J18.04 R17.2 | length 319.8
  Top Layer w10: J18.04@2480,1210 2480,1369.57 R17.2@2589.09,1478.66
  Top Layer w19.68: R17.2@2589.09,1478.66 R17.2@2595,1478.66
NetJ19_01: J19.01 K5.3 | length 934.9
  Top Layer w78.74: K5.3@5185,4279.41 5239.41,4279.41 5710,4750 J19.01@5710,4965
NetJ19_02: J19.02 K5.2 | length 609.3
  Top Layer w78.74: K5.2@5185,4555 5280,4650 5355,4650 5560,4855 J19.02@5560,4965
NetJ20_01: J20.01 K6.3 | length 766.4
  Top Layer w78.74: K6.3@4015,4279.41 4210,4474.41 J20.01@4210,4965
NetJ20_02: J20.02 K6.2 | length 428.6
  Top Layer w78.74: K6.2@4015,4555 4015,4920 J20.02@4060,4965
NetK1_3: K1.3 R47.1 | length 736.7
  Top Layer w7.87: R47.1@2761.58,4820 2761.58,4752.83 K1.3@3235,4279.41
NetQ1_1: Q1.1 R4.2 | length 173.3
  Top Layer w7.87: Q1.1@2010,1560 2100.55,1650.55 2100.55,1676.1 R4.2@2114.45,1690
NetR9_1: R9.1 U4.28 | length 225
  Top Layer w7.87: U4.28@4103.9,2336.5 4103.9,2305.9 4105.87,2303.93 4105.87,2302.22 4105.87,2299.63 4150,2255.5 4150,2162.61 4167.05,2145.55 R9.1@4175,2145.55
NetR10_1: R10.1 U5.5 | length 425.9
  Top Layer w7.87: R10.1@4180,3270.55 4187.95,3270.55 4223.5,3235 4223.5,3176.95 4229.41,3171.05 4229.41,3057.58 4211.19,3039.36 4211.19,3000.14 4225.14,2986.19 4255.3,2986.19 4264.75,2995.63 U5.5@4324.29,2995.63
NetR11_2: R11.2 U3.8 | length 136.3
  Top Layer w7.87: U3.8@5120,2799.98 5235.55,2799.98 5249.45,2786.08 R11.2@5249.45,2785
NetR13_1: R13.1 U4.60 | length 177.6
  Top Layer w7.87: U4.60@3966.1,2773.5 3966.1,2888.15 4005,2927.05 R13.1@4005,2935
OPTOCOUPLER_CATHODE: J4.01 Q1.2 | length 607.8
  Top Layer w7.87: J4.01@1605,1220 1636.5,1251.5 1636.5,1286.5 Q1.2@2010,1660
OPTOCOUPLER_COLLECTOR: C14.2 Q1.4 R3.2 U4.27 | length 2959.6
  Top Layer w7.87: C14.2@1580,1561.46 1581.46,1560 Q1.4@1710,1560 1718.66,1568.66 1746.06,1568.66 R3.2@1954.45,1777.05 ; U4.27@4084.21,2336.5 4084.21,2240.79 v2(4105,2220)
  Top Layer w15: R3.2@1954.45,1785 1954.45,1777.05 1987.66,1743.84 2436.53,1743.84 2697.69,2005 v2(3620,2005)
  Bottom Layer w7.87: v2(3620,2005) 3675,2060 3825,2060 3985,2220 v2(4105,2220)
OSC_IN: C9.2 R8.1 U4.5 X1.1 | length 935.6
  Top Layer w7.87: C9.2@3510,3335.47 3517.87,3335.47 3547.01,3306.34 R8.1@3625,3306.34 3630.91,3306.34 3662.56,3274.68 3662.56,3094.51 3635,3066.95 X1.1@3635,2985 3635,2945 3707.92,2872.08 3707.92,2697.57 3780.85,2624.65 3815.74,2624.65 U4.5@3816.5,2623.9
OSC_OUT: C10.2 R8.2 U4.6 X1.2 | length 905.9
  Top Layer w7.87: C10.2@3515,3180.47 3575.91,3180.47 3619.09,3223.66 R8.2@3625,3223.66 3625,3150 3590,3115 3590,2838 X1.2@3635,2793 3635,2700 3658.03,2676.97 3685.21,2676.97 3757.97,2604.21 U4.6@3816.5,2604.21
PA13: P2.2 U4.46 | length 4542.9
  Top Layer w7.87: U4.46@4253.5,2663.27 4481.56,2663.27 4489.83,2671.54 4498,2671.54 4516.47,2690 4700.39,2690 4700.39,2832.66 4821.94,2954.21 4821.94,2981.94 v3(4830,2990) ; v3(5470,2495) 5609.25,2634.25 5609.25,3177.73 5836.72,3405.2 5923.28,3405.2 6047.44,3281.03 6047.44,2916.31 6247.06,2716.69 6288,2716.69 6308.31,2696.39 6308.31,2623.61 6091.37,2406.67 6091.37,2193.63 P2.2@6270,2015
  Bottom Layer w7.87: v3(4830,2990) 5325,2495 v3(5470,2495)
PA14: P2.3 U4.49 | length 2987.3
  Top Layer w10: U4.49@4182.64,2773.5 4182.64,2788.1 4183.47,2788.94 4334.45,2788.94 4342.16,2796.65 4408.32,2796.65 4419.97,2785.01 4419.97,2753.2 4452.87,2720.3 4452.87,2704.43 4468.96,2688.35 4491.04,2688.35 4665,2862.31 v3(4665,2910) ; v3(6030,1840) 6149.37,1959.37 6277.12,1959.37 6314.37,1996.62 6314.37,2033.38 6279.24,2068.5 6279.24,2105.76 P2.3@6270,2115
  Bottom Layer w10: v3(4665,2910) 5735,1840 v3(6030,1840)
PAN_DIR: U4.26 U7.3 | length 374.1
  Top Layer w7.87: U4.26@4064.53,2336.5 4064.53,1990.19 4068.98,1985.74 U7.3@4068.98,1964.27
PAN_DIR_OUT: R36.1 U7.18 | length 247.8
  Top Layer w7.87: U7.18@4068.98,1745.73 4068.98,1682.32 4197.88,1553.42 R36.1@4200,1553.42
PAN_PUL: U4.41 U7.1 | length 1215.5
  Top Layer w7.87: U7.1@4120.16,1964.27 4120.16,1967.23 4122.93,1970 v2(4190,1970) ; U4.41@4253.5,2564.84 4520.16,2564.84 4538.2,2546.8 4538.2,2526.8 4551.23,2513.77 4571.23,2513.77 v2(4575,2510)
  Bottom Layer w7.87: v2(4190,1970) 4235,2015 4375,2015 4438.19,2078.19 4438.19,2085.25 4459.75,2106.81 4466.81,2106.81 4575,2215 v2(4575,2510)
PAN_PUL_OUT: R37.1 U7.20 | length 327.6
  Top Layer w7.87: U7.20@4120.16,1745.73 4120.16,1731.88 4122.72,1729.32 4138.68,1729.32 4314.58,1553.42 R37.1@4360,1553.42
PC0: U4.8 U6.6 | length 1074.6
  Top Layer w7.87: U6.6@3305,3278.78 3305,2857.6 3517.13,2645.47 3663.95,2645.47 3709.02,2600.41 3709.02,2575.13 3726.42,2557.72 3764.78,2557.72 3771.91,2564.84 U4.8@3816.5,2564.84
PC1: U4.9 U6.5 | length 1128.6
  Top Layer w7.87: U6.5@3255,3278.78 3255,3095 3270,3080 3270,2869.54 3527.69,2611.85 3537.69,2611.85 3555.56,2629.72 3657.43,2629.72 3693.27,2593.89 3693.27,2568.61 3719.9,2541.97 3771.31,2541.97 3773.74,2544.4 3815.74,2544.4 U4.9@3816.5,2545.16
PC2: U4.10 U6.4 | length 1167.8
  Top Layer w7.87: U6.4@3205,3278.78 3205,3105 3250,3060 3250,2867.27 3521.17,2596.1 3544.21,2596.1 3562.09,2613.98 3650.91,2613.98 3677.52,2587.36 3677.52,2562.08 3714.13,2525.47 U4.10@3816.5,2525.47
PC3: U4.11 U6.3 | length 1209.7
  Top Layer w7.87: U6.3@3155,3278.78 3155,3105 3234.25,3025.75 3234.25,2860.75 3514.65,2580.35 3550.74,2580.35 3568.61,2598.23 3644.38,2598.23 3661.77,2580.84 3661.77,2555.56 3711.39,2505.94 3816.34,2505.94 U4.11@3816.5,2505.79
PC4: U4.16 U6.1 | length 1401.5
  Top Layer w7.87: U6.1@3055,3278.78 3055,3125 3200,2980 3200,2747.77 3312.44,2635.33 3312.44,2562.56 3467.64,2407.36 3520.91,2407.36 3533.39,2394.88 3706.1,2394.88 3718.58,2407.36 U4.16@3816.5,2407.36
PC5: U4.15 U6.2 | length 1359.5
  Top Layer w7.87: U6.2@3105,3278.78 3105,3100 3215.75,2989.25 3215.75,2754.29 3328.19,2641.85 3328.19,2574.92 3480,2423.11 3527.43,2423.11 3539.91,2410.63 3699.58,2410.63 3715.99,2427.05 U4.15@3816.5,2427.05
RC_SIGNAL: J2.1 U4.17 | length 1690.7
  Top Layer w10: v3(3645,2105) 3646.65,2103.35 3646.65,1940.65 3672.31,1915 v3(3820,1915) ; v3(3802.8,2278.21) 3861.09,2336.5 U4.17@3887.36,2336.5 ; v3(4270,1750) 4345,1675 J2.1@4715,1675
  Bottom Layer w10: v3(3645,2105) v3@3802.8,2262.8 ; v3(3820,1915) 3985,1750 v3(4270,1750)
  Bottom Layer w19.68: v3@3802.8,2262.8 v3(3802.8,2278.21)
RESET: C24.2 C35.2 P2.5 R15.2 SW1.B1 SW1.B2 U4.7 | length 4154.6
  Top Layer w7.87: v2(3580,3150) 3574.67,3150 3559.67,3135 3510,3135 3494.93,3119.93 3494.93,2689.93 3523.65,2661.22 3670.47,2661.22 3747.17,2584.53 U4.7@3816.5,2584.53 ; SW1.B1@3827.05,3036.42 SW1.B2@4082.95,3036.42 4135.04,3036.42 4160.08,3061.46 C24.2@4165,3061.46 4170,3056.46 R15.2@4170,2991.44 4186.84,2974.6 4214.45,2974.6 4218.61,2970.44 4226.92,2970.44 4267.44,2929.92 C35.2@4267.44,2925
  Top Layer w10: C35.2@4267.44,2925 4284.09,2941.65 4284.09,2952.97 4295.57,2964.45 4349.55,2964.45 4369.43,2944.56 4369.43,2932.65 v3(4377.09,2925) ; v3(4460,2875) 4538.83,2875 v3(4655.36,2991.53)
  Bottom Layer w7.87: v2(3580,3150) 3750,3150 3826.86,3073.14 3826.86,3036.61 SW1.B1@3827.05,3036.42
  Bottom Layer w10: v3(4377.09,2925) 4420,2882.09 4452.91,2882.09 v3(4460,2875) ; v3(4655.36,2991.53) 5331.89,2315 P2.5@6270,2315
RPWM: U4.56 U7.7 | length 1859.4
  Top Layer w7.87: v2(3910.37,2074.63) 3914.13,2070.87 3934.13,2070.87 3966.61,2038.39 U7.7@3966.61,1964.27 ; U4.56@4044.84,2773.5 4045.6,2774.26 4045.6,2809.15 4069.2,2832.76 4165.04,2832.76 4168.78,2836.5 4196.5,2836.5 4200.24,2832.76 4202.66,2832.76 4213.92,2821.5 4320.96,2821.5 4332.22,2832.76 4427.91,2832.76 4438.23,2822.44 4457.56,2822.44 4485.47,2794.53 4485.47,2786.65 4480,2781.18 v2(4480,2715)
  Bottom Layer w7.87: v2(3910.37,2074.63) 3935.91,2100.18 3935.91,2114.1 3966.81,2145 4380,2145 4465,2230 4465,2694.67 4480,2709.67 v2(4480,2715)
RPWM_OUT: R17.1 U7.14 | length 1533.3
  Top Layer w7.87: R17.1@2595,1561.34 2600.91,1561.34 2854.57,1815 3945,1815 3966.61,1793.39 U7.14@3966.61,1745.73
SERVO_PWM: U4.50 U7.8 | length 1656.8
  Top Layer w7.87: v2(3864.56,2051.1) 3869.2,2051.1 3884.97,2035.32 3890.54,2035.32 3941.02,1984.84 U7.8@3941.02,1964.27 ; U4.50@4162.95,2773.5 4163.71,2774.26 4163.71,2809.15 4175.3,2820.75 4189.98,2820.75 4197.26,2813.46 4199.68,2813.46 4207.4,2805.75 4327.48,2805.75 4335.2,2813.46 4415.29,2813.46 4446.62,2782.13 v2(4446.62,2778.43)
  Bottom Layer w7.87: v2(3864.56,2051.1) 3884.78,2071.31 3884.78,2085.23 3970.04,2170.5 4335.5,2170.5 4410,2245 4410,2730 4431.65,2751.65 4431.65,2758.13 4446.62,2773.11 v2(4446.62,2778.43)
SERVO_PWM_OUT: R19.1 U7.13 | length 474.7
  Top Layer w7.87: R19.1@3505,1681.34 3897.2,1681.34 3941.02,1725.16 U7.13@3941.02,1745.73
STEER_ANGLE: C33.2 R35.2 U4.20 | length 3428.5
  Top Layer w10: v3(3835,2015) 3835,2112.82 3946.42,2224.23 U4.20@3946.42,2336.5 ; v3(5915,1655) 5925.82,1655 5947.91,1677.09 C33.2@6060,1677.09 6076.65,1660.43 6086,1660.43 6099.45,1646.99 6099.45,1456.48 6159.23,1396.69 6240.77,1396.69 6248.31,1404.23 6248.31,1429.51 6256.61,1437.81 6256.61,1622.16 R35.2@6269.45,1635
  Bottom Layer w10: v3(3835,2015) 4107.31,2015 4490.1,1632.2 5284.95,1632.2 5307.74,1655 v3(5915,1655)
TILT_DIR: U4.24 U7.5 | length 375.3
  Top Layer w7.87: U7.5@4017.8,1964.27 4017.8,1985.74 4025.16,1993.1 U4.24@4025.16,2336.5
TILT_DIR_OUT: R33.1 U7.16 | length 268.3
  Top Layer w7.87: R33.1@3835,1568.42 3857.73,1591.15 3883.78,1591.15 4017.8,1725.16 U7.16@4017.8,1745.73
TILT_PUL: U4.25 U7.4 | length 372.8
  Top Layer w7.87: U7.4@4043.39,1964.27 4044.11,1965 4044.11,2335.77 U4.25@4044.84,2336.5
TILT_PUL_OUT: R34.1 U7.17 | length 193.6
  Top Layer w7.87: R34.1@3995,1573.42 3997.12,1573.42 4043.39,1619.69 U7.17@4043.39,1745.73
TRIG_ALL: R12.1 R14.1 U8.13 | length 1426.8
  Top Layer w7.87: U8.13@4789.27,2271.02 4809.84,2271.02 4865.68,2215.19 4865.68,1709.32 4919.44,1655.56 ; 4920,1655 5189.65,1655 5193.15,1658.5 5276.85,1658.5 5280.35,1655 5346.58,1655 R14.1@5481.58,1790
  Top Layer w15: R14.1@5481.58,1790 R12.1@5481.58,1915
VDDA: C22.2 C23.2 FB1.2 U4.13 | length 294.1
  Top Layer w10: 3766.42,2466.42 U4.13@3816.5,2466.42
  Top Layer w19.68: C22.2@3606.5,2540 3610.02,2536.48 3610.02,2463.52 C23.2@3613.54,2460 3618.54,2455 3670,2455 FB1.2@3675,2450 ; FB1.2@3675,2456.57 3684.84,2466.42 3766.42,2466.42
pads on no net: P3.4 P3.5 U3.5 U4.2 U4.3 U4.4 U4.14 U4.21 U4.22 U4.23 U4.29 U4.30 U4.33 U4.51 U4.52 U4.53 U4.54 U4.55 U4.61 U4.62 U5.7 U5.8 U5.9 U6.7 U6.10 U7.9 U7.12 U8.9 U8.12

## Polygon pours and split planes (outlines as drawn)
GND on Bottom Layer "top gnd" (solid, remove dead copper, pour order 1): 1355,5120 6460,5120 6460,1000 1355,1000
GND on Top Layer "top gnd" (solid, remove dead copper, pour order 0): 1355,5120 6460,5120 6460,1000 1355,1000

## Silkscreen, mask and mechanical layers (free items; w line width, h text height)
Top Overlay:
  text "12V" at 2187.13,4955.96 h47.24 r90
  text "GND" at 1642.13,4947.03 h47.24 r90
  text "GND" at 6157.13,4612.03 h47.24 r90
  text "CANH" at 6162.13,4383.41 h47.24 r90
  text "CANL" at 6162.13,4163.41 h47.24 r90
  text "ECHO1" at 5652.13,4002.67 h47.24 r90
  text "ECHO2" at 5652.13,3739.8 h47.24 r90
  text "GND" at 6402.13,3657.03 h47.24 r90
  text "ECHO3" at 5652.13,3464.8 h47.24 r90
  text "RX" at 6387.13,3375.64 h47.24 r90
  text "TX" at 6387.13,3270.64 h47.24 r90
  text "TRIG" at 5552.13,3267.35 h47.24 r90
  text "5V" at 6387.13,3160.64 h47.24 r90
  text "ECHO4" at 5642.13,2969.8 h47.24 r90
  text "RX" at 6392.13,2925.64 h47.24 r90
  text "TX" at 6472.13,2825.64 h47.24 r90
  text "ECHO5" at 5642.13,2719.8 h47.24 r90
  text "GND" at 6397.13,2717.03 h47.24 r90
  text "5V" at 6397.13,2610.64 h47.24 r90
  text "ECHO6" at 5642.13,2464.8 h47.24 r90
  text "RESET" at 6417.13,2319.8 h47.24 r90
  text "TRIG" at 5647.13,2257.35 h47.24 r90
  text "GND" at 6502.13,2172.03 h47.24 r90
  text "SWCLK" at 6417.13,2039.8 h47.24 r90
  text "SWDIO" at 6502.13,1883.74 h47.24 r90
  text "3.3V" at 6422.13,1807.35 h47.24 r90
  text "RC" at 4577.87,1719.36 h47.24 r270
  text "5V" at 4572.87,1604.36 h47.24 r270
  text "GND" at 4577.87,1487.97 h47.24 r270
  text "E-STOP" at 1772.87,1438.81 h47.24 r270
  text "3.3V" at 6512.13,1402.35 h47.24 r90
  text "GND" at 6512.13,1242.03 h47.24 r90
  text "TILT" at 3787.35,1162.87 h47.24
  text "5V" at 5510.64,1107.87 h47.24
  text "GND" at 5702.03,1102.87 h47.24
  text "PAN" at 4832.03,1097.87 h47.24
  text "GND" at 5162.03,1097.87 h47.24
  text "5V" at 5015.64,1092.87 h47.24
  text "Out" at 6512.13,1084.9 h47.24 r90
  text "GND" at 2662.03,1037.87 h47.24
  text "R_PWM" at 2404.8,1035.75 h47.24
  text "5V" at 1850.64,1032.87 h47.24
  text "5V" at 2000.64,1032.87 h47.24
  text "24V" at 2972.03,1032.87 h47.24
  text "24V" at 3142.03,1032.87 h47.24
  text "SIGNAL" at 3295.12,1032.87 h47.24
  text "GND" at 3607.03,1032.87 h47.24
  text "L_PWM" at 2144.8,1030.75 h47.24
  text "GND" at 4717.03,1017.87 h47.24
  text "DIR" at 4000.96,1012.87 h47.24
  text "PUL" at 4192.03,1012.87 h47.24
  text "PUL" at 4382.03,1012.87 h47.24
  text "DIR" at 4555.96,1012.87 h47.24

## Text inside footprints (layer, text, board x,y; h text height)
C27: Top Overlay "+" at 2962.86,3874.53 h59.06 r180